# Altium PCB esp32 nfc pcb.PcbDoc
Units mm, origin at the board's own origin, x right, y up, seen from the top; angles counter-clockwise.
Board outline 27.4 x 13.3 mm, 5 copper layers (Top, Route2, Route14, Route15, Bottom), stack 0.926 mm thick; 69 components, 51 nets, 235 pads, 58 vias.
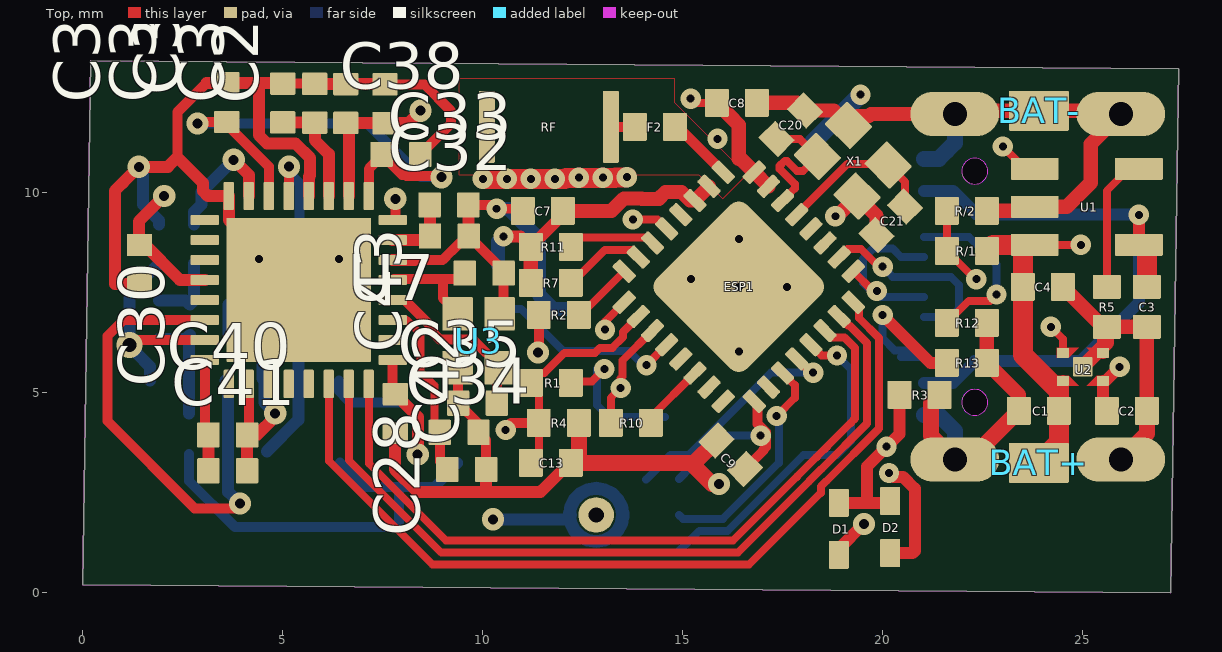
[diagram p0: Top view]
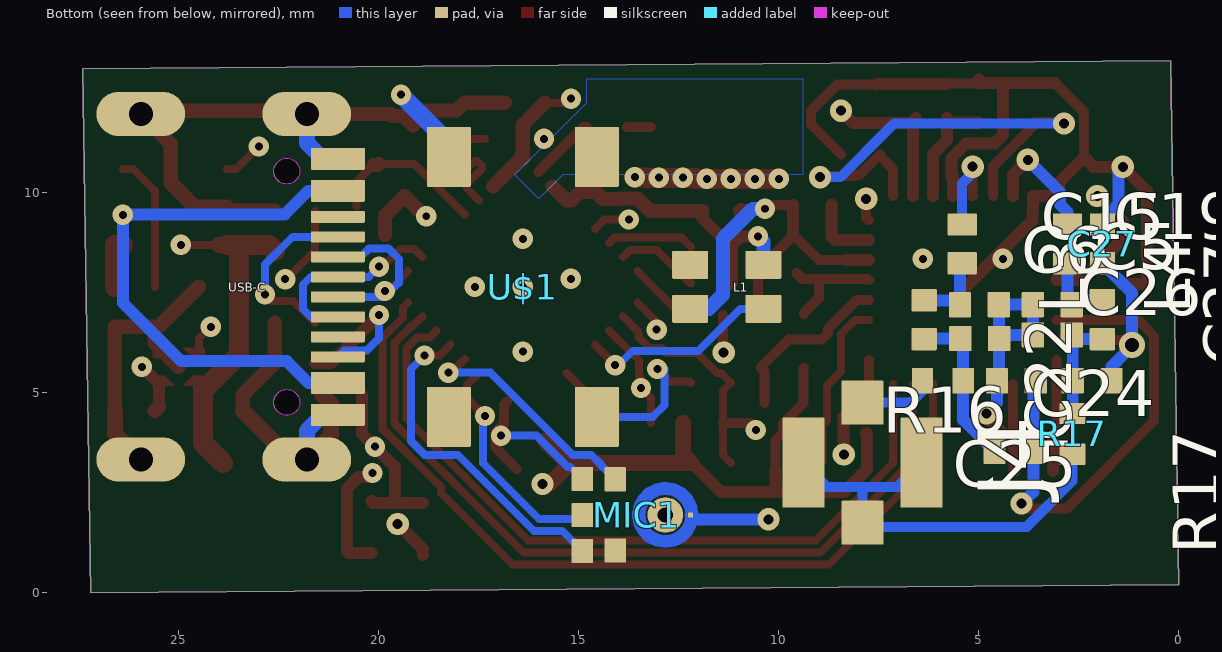
[diagram p1: Bottom view, seen from below]
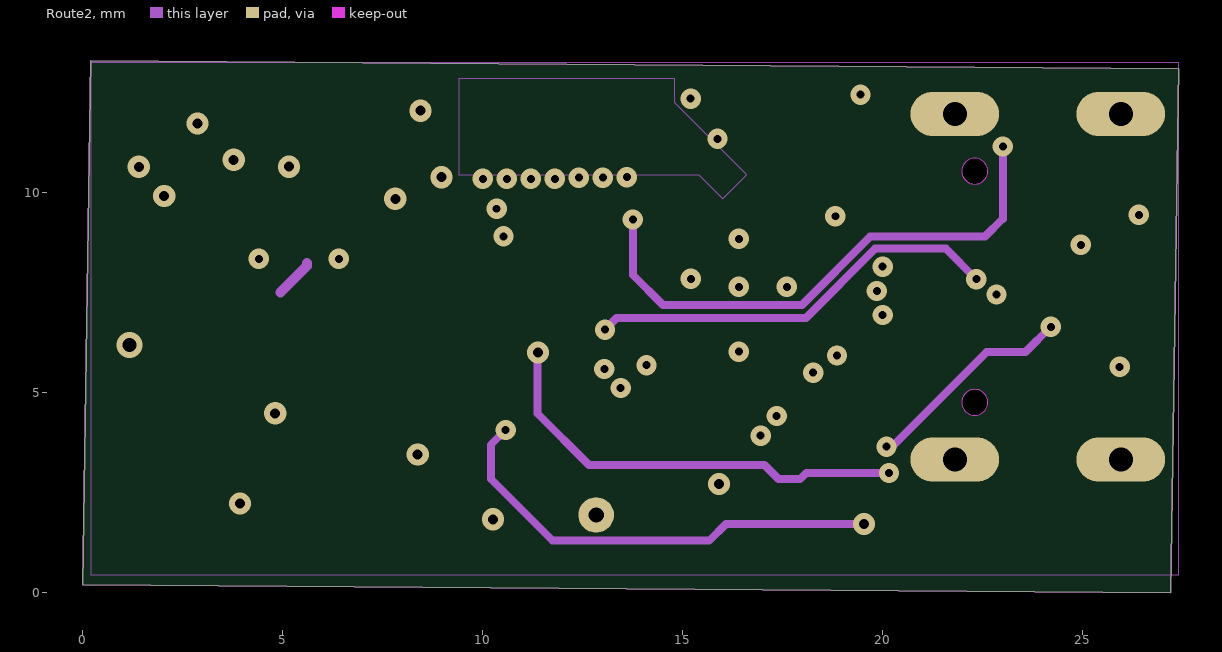
[diagram p2: Route2]
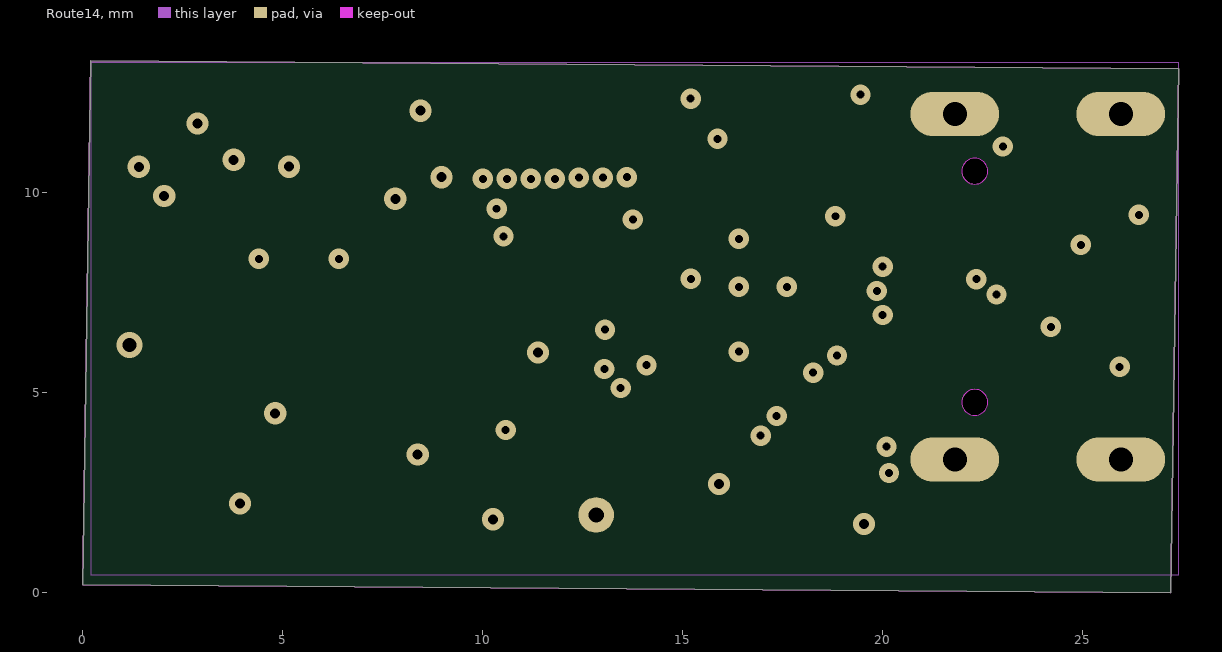
[diagram p3: Route14]
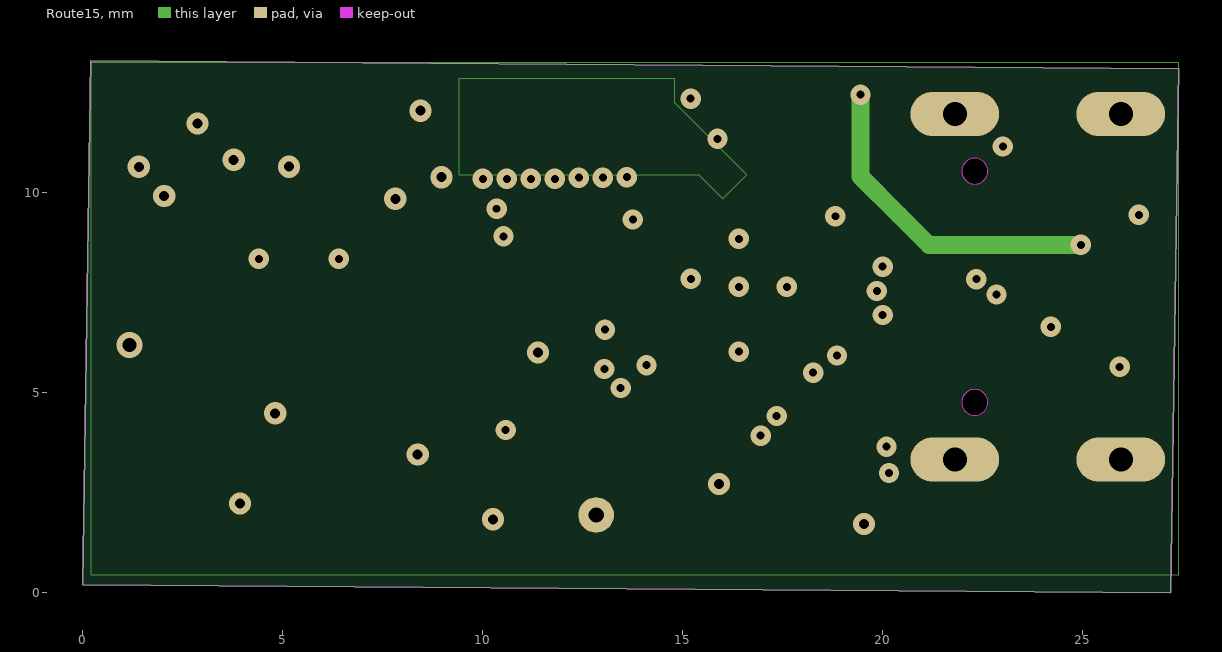
[diagram p4: Route15]

## Layer stack, top to bottom
Top Solder: solder mask 0.0102, Solder Resist, Dk 3.5
Top: signal copper 0.035
Dielectric 1: core 0.2, FR-4, Dk 4.8
Route2: signal copper 0.0175
Dielectric2: prepreg 0.265, FR-4, Dk 4.8
Route14: signal copper 0.0356
Route15: signal copper 0.0175
Dielectric3: dielectric 0.32, FR-4, Dk 4.8
Bottom: signal copper 0.035
Bottom Solder: solder mask 0.0102, Solder Resist, Dk 3.5

## Board outline
27.4,13.1 0.2,13.3 0,0.2 27.2,0
cut-out: 22.3,10.215 ccw(c22.3,10.54) 22.625,10.54 ccw(c22.3,10.54) 22.3,10.865 ccw(c22.3,10.54) 21.975,10.54 ccw(c22.3,10.54)
cut-out: 22.3,4.435 ccw(c22.3,4.76) 22.625,4.76 ccw(c22.3,4.76) 22.3,5.085 ccw(c22.3,4.76) 21.975,4.76 ccw(c22.3,4.76)

## Design rules (kind name [scope] priority, off if disabled: settings)
BoardOutlineClearance mdCopperDimension [All] p1: gap=0.254 ignorepadtopadclearanceinfootprint=FALSE except(0: Arc-SplitContinuation Track-SplitContinuation SMDPad-SplitContinuation THPad-SplitContinuation Via-SplitContinuation Fill-SplitContinuation Poly-SplitContinuation Region-SplitContinuation Text-SplitContinuation)
Clearance "Clearance (Same Net)" [All] p1: gap=0.1 ignorepadtopadclearanceinfootprint=FALSE
Clearance [All] p2: gap=0.1 ignorepadtopadclearanceinfootprint=FALSE
HoleSize [All] p1: absolutevalues=TRUE maxlimit=2540 minlimit=0.2 maxpercent=80.000 minpercent=20.000
HoleToHoleClearance mdDrill [All] p1: gap=0.152 allowstackedmicrovias=TRUE
MinimumSolderMaskSliver [All] p1 off: minsoldermaskwidth=0.254
PasteMaskExpansion Expansion_SMDPaste_OFF [InPadClass('SMDPaste_OFF')] p1: expansion=0
PasteMaskExpansion mlMinCreamFrame [All] p2: expansion=0
PolygonConnect PolygonConnect_For_PolygonThermal_ON_Width118100_Gap40000 [InPolygonClass('PolygonThermal_ON_Width118100_Gap40000') vs Not IsVia] p1: connectstyle=Relief reliefconductorwidth=0.3 reliefentries=4 polygonreliefangle="90 Angle" airgapwidth=0.102
PolygonConnect PolygonConnect_For_PolygonThermal_ON_Width60000_Gap40000 [InPolygonClass('PolygonThermal_ON_Width60000_Gap40000') vs Not IsVia] p2: connectstyle=Relief reliefconductorwidth=0.152 reliefentries=4 polygonreliefangle="90 Angle" airgapwidth=0.102
PolygonConnect ThermalVias [IsVia] p3: connectstyle=Direct reliefconductorwidth=0.254 reliefentries=4 polygonreliefangle="90 Angle" airgapwidth=0.254
PolygonConnect [All] p4: connectstyle=Relief reliefconductorwidth=0.254 reliefentries=4 polygonreliefangle="90 Angle" airgapwidth=0.254
RoutingVias [All] p1: holewidth=0.2 width=0.505 viastyle="Through Hole" minholewidth=0.2 minwidth=0.505 maxholewidth=2.54 maxwidth=2.54
SolderMaskExpansion Expansion_SMDSolder_OFF [InPadClass('SMDSolder_OFF')] p1: expansion=0 istentingtop=FALSE
SolderMaskExpansion mlMinStopFrame [All] p2: expansion=0 istentingtop=FALSE
Width [All] p1: maxlimit=0.254 minlimit=0.152 preferedwidth=0.152
26 further rules are at their usual default settings.

## Classes and differential pairs
polygon class PolygonThermal_ON_Width118100_Gap40000: Polygon_1_Net_+3V3
polygon class PolygonThermal_ON_Width60000_Gap40000: Polygon_1_Net_GND Polygon_1_NoNet Polygon_2_Net_GND Polygon_2_NoNet Polygon_3_NoNet Polygon_4_NoNet
pad class SMDSolder_OFF: ESP1-1 ESP1-2 ESP1-3 ESP1-4 ESP1-5 ESP1-6 ESP1-7 ESP1-8 ESP1-9 ESP1-10 ESP1-11 ESP1-12 ESP1-13 ESP1-14 ESP1-15 ESP1-16 ESP1-17 ESP1-18 ESP1-19 ESP1-20 ESP1-21 ESP1-22 ESP1-23 ESP1-24 ESP1-25 ESP1-26 ESP1-27 ESP1-28 ESP1-29 ESP1-30 ESP1-31 ESP1-32 ESP1-EXP U2-P1 U2-P2 U2-P3 U2-P4
pad class SMDPaste_OFF: ESP1-1 ESP1-2 ESP1-3 ESP1-4 ESP1-5 ESP1-6 ESP1-7 ESP1-8 ESP1-9 ESP1-10 ESP1-11 ESP1-12 ESP1-13 ESP1-14 ESP1-15 ESP1-16 ESP1-17 ESP1-18 ESP1-19 ESP1-20 ESP1-21 ESP1-22 ESP1-23 ESP1-24 ESP1-25 ESP1-26 ESP1-27 ESP1-28 ESP1-29 ESP1-30 ESP1-31 ESP1-32 ESP1-EXP U2-P1 U2-P2 U2-P3 U2-P4 U7-33

## Components (designator, comment, footprint, x,y, rotation, side; value= is the part's Value field where it differs from the comment)
BAT+ "" SOLDERPAD_1.5X1.0 23.9,3.25 r90 top
BAT- "" SOLDERPAD_1.5X1.0 23.9,12.05 r90 top
C1 "1µ" C0402_S 23.9,4.55 r0 top
C2 "1µ" C0402_S 26.1,4.55 r180 top
C3 "1µ" C0402_S 26.6,7.15 r90 top
C4 "1µ" C0402_S 24,7.65 r180 top
C5 "" CAPC1005X60 3.162,6.448 r180 bottom
C6 "" CAPC1005X60 4.975,6.356 r180 bottom
C7 "10µ" C0402_S 11.5,9.55 r0 top
C8 "0,1µ" C0402_S 16.35,12.25 r180 top
C9 "0,1µ" C0402_S 16.2,3.45 r315 top
C13 "1µ" C0402_S 11.7,3.25 r180 top
C15 "" CAPC1005X60 4.985,7.202 r180 bottom
C19 "" CAPC1005X60 3.162,7.202 r180 bottom
C20 "10p" C0402_S 17.7,11.7 r225 top
C21 "10p" C0402_S 20.2,9.3 r45 top
C22 "" CAPC1005X60 6.364,6.827 r270 bottom
C23 "" CAPC1005X60 1.911,6.827 r270 bottom
C24 "" CAPC1005X60 2.166,5.301 r0 bottom
C25 "" CAPC1005X60 4.121,3.536 r0 bottom
C26 "" CAPC1005X60 4.059,5.301 r180 bottom
C27 "" CAPC1005X60 1.909,8.721 r270 bottom
C28 "" CAPC1005X60 7.813,4.479 r270 top
C29 "" CAPC1005X60 7.554,12.225 r90 top
C30 "" CAPC1005X60 1.419,8.208 r270 top
C31 "" CAPC1005X60 6.575,12.232 r90 top
C32 "" CAPC1005X60 9.165,8.919 r0 top
C33 "" CAPC1005X60 9.155,9.698 r0 top
C34 "10n" CAPC1005X60 9.6,3.086 r0 top
C35 "" CAPC1005X60 9.41,4.011 r0 top
C36 "" CAPC1005X60 4.999,12.244 r90 top
C37 "" CAPC1005X60 5.799,12.238 r90 top
C38 "" CAPC1005X60 7.955,10.96 r0 top
C39 "" CAPC1005X60 3.599,12.254 r90 top
C40 "" CAPC1005X60 3.625,3.945 r0 top
C41 "" CAPC1005X60 3.625,3.05 r0 top
C42 "" CAPC1005X60 10.036,7.99 r180 top
C43 "" CAPC1005X60 9.869,4.74 r0 top
D1 "4148" SOD523 18.9,1.65 r270 top
D2 "4148" SOD523 20.186,1.694 r270 top
ESP1 "ESP32_C3_QFN32" QFN32 16.4,7.65 r315 top
F2 "0" R0402 14.3,11.65 r180 top
J4 "UMC-JACK" A-1JB 7.903,3.251 r90 bottom
L1 "" WS2812_2020 11.3,7.65 r0 bottom
L3 "" INDC1006X60N 5.414,8.721 r270 bottom
L4 "" INDC1006X60N 2.785,8.721 r270 bottom
MIC1 "SPH0645LM4H-BSPH0645LM4H-B_KNO" SPH0645LM4H-B_KNO 13.598,1.945 r0 bottom
R1 "1k" R0402 11.7,5.25 r0 top
R2 "1k" R0402 11.9,6.95 r0 top
R3 "1M" R0402 20.921,4.95 r180 top
R4 "10k" R0402 11.9,4.25 r180 top
R5 "47.5k" R0402 25.6,7.15 r270 top
R7 "10k" R0402 11.7,7.75 r0 top
R10 "10k" R0402 13.7,4.25 r0 top
R11 "10k" R0402 11.7,8.65 r0 top
R12 "5.1k" R0402 22.1,6.75 r0 top
R13 "5.1k" R0402 22.1,5.75 r0 top
R16 "" RESC1005X40 5.899,5.301 r0 bottom
R17 "" RESC1005X40 2.657,3.973 r270 bottom
R/1 "1M" R0402 22.1,8.55 r180 top
R/2 "250k" R0402 22.1,9.55 r0 top
RF "" ANT3216LL00R2400A 11.65,11.65 r270 top
U1 "" SOT23-5 25.1,9.65 r270 top
U2 "" TDFN4 25,5.65 r90 top
U3 "NX2016SA-27.12MHZ-EXS00A-CS113SMD04_NX2016S_NDK" SMD04_NX2016S_NDK 9.894,6.3 r0 top
U7 "ST25R3916B-AQWTVFQFPN32_5X5_WETTABLE_STM-L" VFQFPN32_5X5_WETTABLE_STM-L 5.4,7.57 r180 top
U$1 "" BUTTON_ST-1187-3 16.4,7.65 r90 bottom
USB-C "" USBC_C393939 21.8,7.65 r270 bottom
X1 "" XTYL_2016 19.25,10.8 r315 top

## Footprints (in the part's own frame and the unit in brackets; to place one, negate y for a bottom-side part, rotate by r counter-clockwise, add the part's x,y. Pads: shape width x height; smd on the part's side, far side on the other; paste and mask are expansions set on the pad)
A-1JB [mm] "A-1JB"
  rrect4% 1.1x1.05 smd: 1(1.5,0) 2_1(-1.5,0)
  rrect4% 2.25x1.05 smd: 2_0(0,1.475) 2_2(0,-1.475)
  body extent -2.05,-2 2.05,2, height 1.27
ANT3216LL00R2400A [mm] "ANT3216LL00R2400A"
  rrect12% 1.8x0.4 smd: P1(0,1.55) P2(0,-1.55)
  body extent -0.9,-1.75 0.9,1.75, height 1.27
BUTTON_ST-1187-3 [mm] "BUTTON_ST-1187-3"
  rrect4% 1.5x1.1 smd: P1(-3.25,1.85) P2(3.25,1.85) P3(-3.25,-1.85) P4(3.25,-1.85)
  body extent -4,-2.4 4,2.4, height 1.27
C0402_S [mm] "C0402_S"
  rrect8% 0.6x0.7 smd: P$1(-0.5,0) P$2(0.5,0)
  body extent -0.8,-0.35 0.8,0.35, height 1.27
CAPC1005X60 [mm] "CAPC1005X60"
  rrect9% 0.56x0.629 smd: 1(-0.485,0) 2(0.485,0)
  body extent -0.77,-0.32 0.77,0.32, height 1.27
INDC1006X60N [mm] "INDC1006X60N"
  rrect9% 0.56x0.729 smd: 1(-0.485,0) 2(0.485,0)
  body extent -0.77,-0.37 0.77,0.37, height 1.27
QFN32 [mm] "QFN32"
  rrect30% 0.6x0.275 smd paste+0 mask+0: 1(-2.3,1.75) 2(-2.3,1.25) 3(-2.3,0.75) 4(-2.3,0.25) 5(-2.3,-0.25) 6(-2.3,-0.75) 7(-2.3,-1.25) 8(-2.3,-1.75) 17(2.3,-1.75) 18(2.3,-1.25) 19(2.3,-0.75) 20(2.3,-0.25) 21(2.3,0.25) 22(2.3,0.75) 23(2.3,1.25) 24(2.3,1.75)
  rrect30% 0.275x0.6 smd paste+0 mask+0: 9(-1.75,-2.3) 10(-1.25,-2.3) 11(-0.75,-2.3) 12(-0.25,-2.3) 13(0.25,-2.3) 14(0.75,-2.3) 15(1.25,-2.3) 16(1.75,-2.3) 25(1.75,2.3) 26(1.25,2.3) 27(0.75,2.3) 28(0.25,2.3) 29(-0.25,2.3) 30(-0.75,2.3) 31(-1.25,2.3) 32(-1.75,2.3)
  rrect20% 3.2x3.2 smd paste+0 mask+0: EXP(0,0)
  body extent -2.6,-2.6 2.6,2.6, height 3.81
R0402 [mm] "R0402"
  rrect8% 0.6x0.7 smd: 1(-0.5,0) 2(0.5,0)
  body extent -0.8,-0.35 0.8,0.35, height 3.81
RESC1005X40 [mm] "RESC1005X40"
  rrect9% 0.535x0.644 smd: 1(-0.507,0) 2(0.507,0)
  body extent -0.78,-0.32 0.78,0.32, height 1.27
SMD04_NX2016S_NDK [mil] "SMD04_NX2016S_NDK"
  rrect6% 30x33 smd: 1(-20.67,26.57) 2(-20.67,-26.57) 3(20.67,-26.57) 4(20.67,26.57)
  body extent -37,-45 37,45, height 150
SOD523 [mm] "SOD523"
  rrect10% 0.7x0.5 smd: A(0.7,0) C(-0.6,0)
  body extent -0.95,-0.46 1.05,0.46, height 3.81
SOLDERPAD_1.5X1.0 [mm] "SOLDERPAD_1.5X1.0"
  rrect5% 1x1.5 smd: 1(0,0)
  body extent -0.5,-0.75 0.5,0.75, height 1.27
SOT23-5 [mm] "SOT23-5"
  rrect9% 0.55x1.2 smd: 1(-0.95,-1.3) 2(0,-1.3) 3(0.95,-1.3) 4(0.95,1.3) 5(-0.95,1.3)
  body extent -1.48,-1.9 1.48,1.9, height 3.81
SPH0645LM4H-B_KNO [mil] "SPH0645LM4H-B_KNO"
  rrect9% 21x24 smd: 1(51.59,35.43) 2(19.24,35) 4(19.24,-35) 5(51.59,-35.43) 6(51.59,0)
  rrect40% 5x5 smd: 3(-55,0)
  round 35 hole 15: 7(-30.06,0)
  Top region: -40.1,-30.91 -30.06,-32.51 -20.01,-30.91 -10.94,-26.3 -3.76,-19.11 0.86,-10.05 2.44,-0.03 2.3,3.33 -10.15,2.25 -10.05,0.05 -10.06,0.06 -10.06,0.03 -10.06,0.03 -10.06,0.04 -11.04,-6.19 -11.05,-6.18 -11.04,-6.17 -11.04,-6.18 -11.04,-6.17 -13.88,-11.75 -13.88,-11.75 -13.87,-11.75 -13.88,-11.76 -13.89,-11.76 -18.29,-16.17 -18.29,-16.18 -18.3,-16.19 -18.3,-16.18 -18.3,-16.18 -23.88,-19.02 -23.87,-19.02 -23.86,-19.02 -23.88,-19.03 -23.9,-19.02 -30.05,-19.99 -30.06,-19.99 -30.06,-19.99 -30.06,-19.99 -30.06,-19.99 -36.21,-19.02 -36.23,-19.03 -36.25,-19.02 -36.24,-19.02 -36.23,-19.02 -41.81,-16.18 -41.81,-16.18 -41.81,-16.19 -41.82,-16.18 -41.82,-16.17 -46.22,-11.76 -46.23,-11.76 -46.24,-11.75 -46.23,-11.75 -46.23,-11.75 -49.07,-6.17 -49.07,-6.18 -49.07,-6.17 -49.06,-6.18 -49.07,-6.19 -50.05,0.04 -50.06,0.05 -50.06,0.03 -50.06,0.04 -50.06,0.05 -49.96,2.25 -62.41,3.33 -62.56,-0.03 -60.97,-10.05 -56.35,-19.11 -49.17,-26.3
  Top region: -10.15,-2.25 2.3,-3.33 2.44,0.03 0.86,10.05 -3.76,19.11 -10.94,26.3 -20.01,30.91 -30.06,32.51 -40.1,30.91 -49.17,26.3 -56.35,19.11 -60.97,10.05 -62.56,0.03 -62.41,-3.33 -49.96,-2.25 -50.06,-0.05 -50.06,-0.04 -50.06,-0.03 -50.06,-0.05 -50.05,-0.04 -49.07,6.19 -49.06,6.18 -49.07,6.17 -49.07,6.18 -49.07,6.17 -46.23,11.75 -46.23,11.75 -46.24,11.75 -46.23,11.76 -46.22,11.76 -41.82,16.17 -41.82,16.18 -41.81,16.19 -41.81,16.18 -41.81,16.18 -36.23,19.02 -36.24,19.02 -36.25,19.02 -36.23,19.03 -36.21,19.02 -30.06,19.99 -30.06,19.99 -30.06,19.99 -30.06,19.99 -30.05,19.99 -23.9,19.02 -23.88,19.03 -23.86,19.02 -23.87,19.02 -23.88,19.02 -18.3,16.18 -18.3,16.18 -18.3,16.19 -18.29,16.18 -18.29,16.17 -13.89,11.76 -13.88,11.76 -13.87,11.75 -13.88,11.75 -13.88,11.75 -11.04,6.17 -11.04,6.18 -11.04,6.17 -11.05,6.18 -11.04,6.19 -10.06,-0.04 -10.06,-0.03 -10.06,-0.03 -10.06,-0.06 -10.05,-0.05
  body extent -62,-48 62,48, height 150
TDFN4 [mm] "TDFN4"
  rrect10% 0.48x0.48 smd: EXP(0,0)
  rrect10% 0.25x0.3 smd paste+0 mask+0: P1(-0.35,-0.5) P2(0.35,-0.5) P3(0.35,0.5) P4(-0.35,0.5)
  Top region: -0.475,-0.65 -0.225,-0.65 -0.225,-0.35 -0.475,-0.1
  Top region: 0.225,-0.65 0.475,-0.65 0.475,-0.1 0.225,-0.35
  Top region: 0.225,0.35 0.475,0.1 0.475,0.65 0.225,0.65
  Top region: -0.475,0.65 -0.475,0.1 -0.225,0.35 -0.225,0.65
  body extent -0.64,-0.65 0.48,0.65, height 3.81
USBC_C393939 [mm] "USBC_C393939"
  rrect9% 0.55x1.35 smd: A1B12(-3.2,0.775) A4B9(-2.4,0.775) B1A12(3.2,0.775) B4A9(2.4,0.775)
  rrect18% 0.275x1.35 smd: A5(-1.25,0.775) A6(-0.25,0.775) A7(0.25,0.775) B5(1.75,0.775) B6(0.75,0.775) B7(-0.75,0.775) B8(1.25,0.775)
  rrect16% 0.3x1.35 smd: A8(-1.75,0.775)
  oval 1.108x2.216 hole 0.6: S1(-4.32,0) S2(4.32,0) S3(-4.32,-4.15) S4(4.32,-4.15)
  body extent -4.88,-5.27 4.88,1.45, height 1.27
VFQFPN32_5X5_WETTABLE_STM-L [mil] "VFQFPN32_5X5_WETTABLE_STM-L"
  rrect20% 28x10 smd: 1(-92.5,68.9) 2(-92.5,49.21) 3(-92.5,29.53) 4(-92.5,9.84) 5(-92.5,-9.84) 6(-92.5,-29.53) 7(-92.5,-49.21) 8(-92.5,-68.9) 17(92.5,-68.9) 18(92.5,-49.21) 19(92.5,-29.53) 20(92.5,-9.84) 21(92.5,9.84) 22(92.5,29.53) 23(92.5,49.21) 24(92.5,68.9)
  rrect20% 10x28 smd: 9(-68.9,-92.5) 10(-49.21,-92.5) 11(-29.53,-92.5) 12(-9.84,-92.5) 13(9.84,-92.5) 14(29.53,-92.5) 15(49.21,-92.5) 16(68.9,-92.5) 25(68.9,92.5) 26(49.21,92.5) 27(29.53,92.5) 28(9.84,92.5) 29(-9.84,92.5) 30(-29.53,92.5) 31(-49.21,92.5) 32(-68.9,92.5)
  rrect1% 142x142 smd paste+0: 33(0,0)
  body extent -107,-107 107,107, height 150
WS2812_2020 [mm] "WS2812_2020"
  rrect7% 0.9x0.7 smd: DI(-0.915,0.55) DO(0.915,-0.55) GND(0.915,0.55) VDD(-0.915,-0.55)
  body extent -1.37,-0.9 1.37,0.9, height 1.27
XTYL_2016 [mil] "XTYL_2016"
  rrect6% 35.43x31.5 smd: P1(-27.56,-21.65) P2(27.56,-21.65) P3(27.56,21.65) P4(-27.56,21.65)
  body extent -45,-37 45,37, height 50

## Part data
BAT+ BAT-: library part SOLDERPAD_1.5X1.0, PackageName=SOLDERPAD_1.5X1.0
C1 C2 C3 C4 C7 C8 C9 C13 C20 C21: library part C0402_S, PackageName=C0402_S
C5 C6 C15 C19 C22 C23 C24 C25 C26 C27 C28 C29 C30 C31 C32 C33 C34 C35 C36 C37 C38 C39 C40 C41 C42 C43: library part CAPC1005X60, PackageName=CAPC1005X60
D1 D2: library part SOD523, PackageName=SOD523
ESP1: library part QFN32, PackageName=QFN32
F2 R1 R2 R3 R4 R5 R7 R10 R11 R12 R13 R/1 R/2: library part R0402, PackageName=R0402
J4: library part A-1JB, PackageName=A-1JB
L1: library part WS2812_2020, PackageName=WS2812_2020
L3 L4: library part INDC1006X60N, PackageName=INDC1006X60N
MIC1: library part SPH0645LM4H-B_KNO, PackageName=SPH0645LM4H-B_KNO
R16 R17: library part RESC1005X40, PackageName=RESC1005X40
RF: library part ANT3216LL00R2400A, PackageName=ANT3216LL00R2400A
U1: library part SOT23-5, PackageName=SOT23-5
U2: library part TDFN4, PackageName=TDFN4
U3: library part SMD04_NX2016S_NDK, PackageName=SMD04_NX2016S_NDK
U7: library part VFQFPN32_5X5_WETTABLE_STM-L, PackageName=VFQFPN32_5X5_WETTABLE_STM-L
U$1: library part BUTTON_ST-1187-3, PackageName=BUTTON_ST-1187-3
USB-C: library part USBC_C393939, PackageName=USBC_C393939
X1: library part XTYL_2016, PackageName=XTYL_2016

## Free pads (board coordinates)
  round 0.65 hole 0.65 unplated: MH1(22.3,4.76) MH2(22.3,10.54)

## Via types
v1: diameter 0.505/0.505/0.505/0.505/0.505 (per signal layer), hole 0.2, Top to Bottom, 42 vias
v2: diameter 0.555/0.555/0.555/0.555/0.555 (per signal layer), hole 0.25, Top to Bottom, 15 vias
v3: diameter 0.655/0.655/0.655/0.655/0.655 (per signal layer), hole 0.35, Top to Bottom, 1 vias

## Nets (pads, with @x,y where several pads share a name; then routed paths per layer and width w, separated by ;. In a path a pad name is that pad's centre, name@x,y a point inside that pad or via, vN(x,y) a via of type N, cw(c..) or ccw(c..) an arc to the next point about the centre after c; other vN are vias at no path point)
+3V3: C2.P$2 C7.P$2 C8.P$2 C9.P$2 C28.1 C29.1 C30.1 C31.1 ESP1.2 ESP1.3 ESP1.11 ESP1.17 ESP1.31 ESP1.32 L1.VDD MIC1.5 R7.1 R10.1 R11.1 U2.P1 U7.1 U7.8 U7.10 U7.20 | length 30.9
  Top w0.2: R10.1 13.2,4.873 v1(13.448,5.121) 13.448,5.361 13.49,5.403 13.49,5.8 ESP1.11 ; v1(15.198,12.352) 15.3,12.25 C8.P$2
  Top w0.25: U7.1 7.75,5.027 C28.1 ; U7.8 7.813,9.383 v2(7.813,9.85) ; C9.P$2 17.017,3.56 17.017,3.584 17.078,3.645 v1@17.078,4.017 ; ESP1.17 16.87,4.705 16.87,4.225 v1@17.078,4.017 ; v1(16.948,3.927) 16.988,3.927 v1@17.078,4.017
  Top w0.3: v2(2.037,9.923) 1.4,9.286 1.4,8.711 C30.1 1.557,8.693 2.4,7.85 2.43,7.82 U7.20 ; U7.10 C31.1@6.65,11.791 ; C28.1 8.377,4.399 8.377,3.641 8.373,3.636 v2(8.373,3.456) ; v2(8.447,12.052) 8.135,11.741 C29.1 6.7,11.741 C31.1@6.65,11.791 ; v1(10.519,8.912) 10.938,8.912 11.2,8.65 11.903,9.353 C7.P$2@11.903,9.55 ; C2.P$2 25.5,4.65 U2.P1 25.573,5.3 v1(25.923,5.65) ; C31.1@6.576,11.749 C31.1 C31.1@6.576,11.749 ; C31.1@6.576,11.749 C31.1@6.576,11.865 ; C31.1@6.576,11.749 C31.1@6.576,11.865 ; C31.1@6.576,11.865 C31.1@6.65,11.791
  Top w0.35: C7.P$2@11.903,9.55 C7.P$2 13.221,9.55 13.521,9.85 13.532,9.861 13.968,9.861 13.979,9.85 14.4,9.85 14.568,10.018 14.971,10.018
  Top w0.352: R7.1@11.2,7.75 R11.1@11.2,8.65 ; 14.971,10.018 15.182,9.807 ESP1.3 ESP1.2 ; C8.P$2 16.274,11.826 16.274,11.815 16.4,11.689 16.4,11.45 16.4,10.85 16.453,10.85 ESP1.32 ESP1.31 ; C2.P$2@25.5,4.65 C2.P$2
  Bottom w0.2: MIC1.5 15.214,3.15 15.278,3.15 16.055,3.927 v1(16.948,3.927)
  Bottom w0.35: L1.VDD 10.385,8.778 v1(10.519,8.912)
+VBAT: BAT+.1 C1.P$2 C4.P$2 R/1.1 U1.3 U2.P4 U$1.P2 | length 19.6
  Top w0.2: U1.3@24,8.7 v1(24.95,8.7)
  Top w0.3: C1.P$2 24.5,4.65 U2.P4
  Top w0.4: U1.3 U1.3@24,8.7
  Top w0.5: R/1.1 22.75,8.7 U1.3@23.4,8.7 ; U1.3 U1.3@23.4,8.7 ; BAT+.1 24.4,3.75 C1.P$2 24.4,5.05 23.5,5.95 C4.P$2 23.5,8.6 U1.3@23.4,8.7
  Route15 w0.45: v1(19.441,12.451) 19.441,10.409 20.4,9.45 21.15,8.7 v1(24.95,8.7)
  Bottom w0.45: U$1.P2 18.25,11.261 v1(19.441,12.451)
ADC: ESP1.9 R/1.2 R/2.1 | length 13.4
  Top w0.2: v1(13.052,6.576) 13.052,6.777 ESP1.9 ; R/2.1 R/1.2 22.31,7.84 v1(22.339,7.84)
  Route2 w0.2: v1(13.052,6.576) 13.347,6.87 18.077,6.87 19.81,8.603 21.576,8.603 v1(22.339,7.84)
BUTTON: C13.P$2 D1.A ESP1.10 R1.1 R4.2 | length 19.1
  Top w0.2: C13.P$2@11.2,3.25 11.4,3.45 R4.2 11.4,5.05 11.2,5.25 11.45,5.5 11.547,5.5 12.047,6 12.807,6 12.931,6.123 13.24,6.123 13.505,6.388 13.505,6.522 ESP1.10@13.89,6.908
  Top w0.25: v1(10.575,4.073) 10.575,4.113 10.711,4.25 R4.2
  Top w0.3: D1.A 18.9,1.095 v2(19.528,1.723)
  Route2 w0.2: v1(10.575,4.073) 10.2,3.698 10.2,2.85 11.749,1.301 15.661,1.301 16.083,1.723 v2(19.528,1.723)
DIN: ESP1.12 L1.DI | length 5
  Top w0.2: v1(14.09,5.69) 14.09,5.693 ESP1.12
  Bottom w0.2: L1.DI 10.958,7.1 12.008,6.05 13.65,6.05 14.01,5.69 v1(14.09,5.69)
EN: ESP1.7 R7.2 | length 2.1
  Top w0.2: R7.2 12.23,7.75 13.054,8.574 13.708,8.574 ESP1.7
EN_LDO: D1.C D2.C R3.2 U2.P3 | length 10.5
  Top w0.2: v1(24.2,6.65) 24.5,6.35 U2.P3
  Top w0.3: D1.C 19.6,2.25 ; D2.C 20.142,2.25 19.6,2.25 ; R3.2 20.421,3.975 v1(20.097,3.651) 19.6,3.154 19.6,2.25
  Route2 w0.2: v1(20.097,3.651) 20.231,3.651 22.599,6.019 23.569,6.019 v1(24.2,6.65)
GND: BAT-.1 C1.P$1 C2.P$1 C3.P$1 C4.P$1 C5.1 C6.2 C7.P$1 C8.P$1 C9.P$1 C13.P$1 C15.2 C19.1 C20.P$1 C21.P$1 C26.1 C27.1 C28.2 C29.2 C30.2 C31.2 C32.2 C33.2 C34.2 C35.2 C36.2 C37.2 C38.2 C39.2 C40.2 C41.2 C42.1 C43.1 ESP1.EXP L1.GND MIC1.3 R3.1 R4.1 R5.2 R12.2 R13.2 R/2.2 U1.2 U2.EXP U2.P2 U3.2 U3.4 U7.6 U7.12 U7.16 U7.26 U7.33 USB-C.A1B12 USB-C.B1A12 USB-C.S1 USB-C.S2 USB-C.S3 USB-C.S4 X1.P2 X1.P4 | length 102.3
  Top w0.2: C32.2@9.597,8.919 9.6,8.919 C32.2 ; C35.2 C35.2@9.895,4.229
  Top w0.25: 2.363,10.887 2.363,12.013 3.089,12.739 ; C40.2 4.15,3.986 U7.26 ; C36.2 C37.2@5.793,12.729 ; C29.2 8.54,12.71 9.2,12.05 9.2,11.721 C38.2@8.439,10.96 ; 8.312,8.32 8.775,8.32 8.997,8.32 9.207,8.529 9.211,8.529 C32.2@9.6,8.919 ; U3.2 9.384,5.61 9.384,4.74 9.895,4.229 C35.2 10.085,3.821 C34.2 ; C33.2 10.25,9.698 v1(10.347,9.6) C7.P$1@10.95,9.6 ; C32.2 10.52,8.048 C42.1 10.52,7.076 U3.4
  Top w0.3: C30.2 0.8,7.724 0.8,10.05 1,10.25 v2(1.4,10.65) 2.126,10.65 2.363,10.887 3,10.25 3,10.05 3.131,9.919 U7.16 3.65,9.527 3.656,9.52 3.656,9.313 U7.33 ; 3.089,12.739 C39.2 ; C41.2 C40.2 4.354,3.945 4.811,4.402 v2(4.811,4.487) ; C36.2 4.989,12.739 C39.2 ; U7.12 5.65,10.404 5.68,10.434 5.68,10.871 5.321,11.229 4.611,11.229 4.4,11.44 4.4,12.739 4.2,12.739 ; C37.2@5.793,12.729 C37.2 ; C37.2@5.8,12.724 C37.2 ; C29.2 7.547,12.717 C31.2 6.576,12.718 6.571,12.723 C37.2 ; U7.6@7.75,8.32 8.312,8.32 ; C28.2 7.8,3.982 7.8,3.082 8.361,2.521 9.269,2.521 10,2.521 ; C33.2 9.649,9.688 C32.2 ; C34.2 10.085,2.606 10,2.521 ; C7.P$1@10.95,9.6 C7.P$1 ; C13.P$1 12.174,3.25 11.574,2.65 11.445,2.521 10,2.521 ; U2.P2 25.5,6.35 R5.2@25.6,6.45 ; C39.2 4.2,12.739 ; 4.2,12.739 4.991,12.739 C36.2@5,12.729 ; C36.2@5,12.729 5,12.835 C36.2@5,12.729
  Top w0.352: C8.P$1 17.857,12.25 C20.P$1 18.774,12.054 X1.P4 19.383,11.923 19.66,11.923 19.707,11.97 USB-C.S1 21.88,12.05 BAT-.1@24.2,12.05 ; v1(18.813,9.413) 18.853,9.413 X1.P2 19.847,9.426 C21.P$1 ; R12.2 R13.2 23.4,4.95 C1.P$1 ; R/2.2 23.7,9.55 U1.2 24.6,9.65 25.2,10.25 25.2,11.22 25.95,11.97 25.87,12.05 BAT-.1@24.2,12.05 ; BAT-.1 BAT-.1@24.2,12.05 ; C4.P$1 25.5,6.65 R5.2 ; U2.EXP 25.6,6.25 25.6,6.45 R5.2 ; C2.P$1 C3.P$1 R5.2
  Top w0.4: R4.1 12.4,3.45 C13.P$1 15.2,3.25 ; C9.P$1 15.293,3.25 15.2,3.25 ; v2(15.905,2.716) 15.734,2.716 15.2,3.25 ; R3.1 21.2,4.729 21.2,4.25 21.2,3.93 USB-C.S2 22.18,3.33 C1.P$1 ; USB-C.S4@25.95,3.33 26.6,3.98 C2.P$1
  Top w0.5: v1(10,10.35) v1(10.6,10.35) v1(11.2,10.35) v1(11.8,10.35) 12.058,10.35 12.083,10.375 v1@12.4,10.375 ; v1(12.4,10.377) v1@12.4,10.375 ; v1(13,10.377) v1@13,10.375 ; v1(13.6,10.388) 13.598,10.386 13.314,10.386 13.304,10.375 v1@13,10.375 ; v1@12.4,10.375 v1@13,10.375
  Route2 w0.25: 4.938,7.507 5.6,8.17 5.6,8.25
  Bottom w0.3: v2(1.4,10.65) 1.509,10.541 1.509,9.704 1.909,9.304 C27.1 ; v2(4.811,4.487) 4.544,4.754 C26.1 4.49,5.355 C6.2 C6.2@4.399,6.448 ; v2(10.256,1.837) 12.093,1.837 MIC1.3 ; C6.2@4.399,6.448 4.5,6.549 C15.2 C19.1 C5.1 C6.2@4.399,6.448
  Bottom w0.35: v1(10.347,9.6) 10.65,9.6 11.4,8.85 11.4,7.45 11.6,7.25 11.75,7.1 L1.GND
  Bottom w0.4: USB-C.B1A12 21.4,4.45 21.8,4.05 USB-C.S2 ; USB-C.A1B12 21.4,10.85 21.6,11.05 21.8,11.25 USB-C.S1
  other v1: 16.4,6.027 16.4,7.65 17.6,7.65 15.2,7.85 4.4,8.35 6.4,8.35 16.4,8.85 15.871,11.35
GPIO2: ESP1.6 R11.2 | length 2.2
  Top w0.2: R11.2 12.431,8.881 14.109,8.881 ESP1.6
GPIO8: ESP1.14 R10.2 | length 1.7
  Top w0.2: R10.2 14.2,4.389 ESP1.14
GPIO9: ESP1.15
GPIO10: ESP1.16
GPIO18: ESP1.25 USB-C.A7 USB-C.B7 | length 4.9
  Top w0.2: ESP1.25 19.757,7.546 v1(19.85,7.546)
  Bottom w0.2: v1(19.85,7.546) v1@19.85,7.4 ; USB-C.A7 v1@19.85,7.4 ; USB-C.B7 20.45,8.4 20.247,8.603 19.753,8.603 19.5,8.35 19.5,7.75 v1@19.85,7.4
GPIO19: ESP1.26 USB-C.A6 USB-C.B6 | length 5
  Top w0.2: ESP1.26 19.118,8.6 19.45,8.6 19.9,8.15 v1(19.998,8.15)
  Bottom w0.2: v1(19.998,8.15) 20.248,7.9 USB-C.A6 21.7,7.9 21.9,7.7 21.9,7.1 21.7,6.9 USB-C.B6
LATCH: ESP1.8 R2.2 | length 1.6
  Top w0.2: R2.2 12.447,6.95 ESP1.8
MISO/SDA: ESP1.22 U7.32 | length 19.1
  Top w0.2: U7.32 7.15,3.237 9.087,1.301 15.665,1.301 16.251,1.301 17.85,2.9 17.85,2.902 18.348,3.4 18.35,3.4 18.6,3.65 ; 18.55,3.6 18.6,3.65 ; ESP1.22 18.728,6.383 19.043,6.383 19.308,6.117 19.308,5.85 ; 19.308,5.743 19.308,5.85 ; 18.6,3.65 19.2,4.25 19.308,4.358 19.308,5.85
MOSI: ESP1.23 U7.31 | length 20.1
  Top w0.2: U7.31 6.65,3.313 8.962,1.001 16.375,1.001 18.15,2.776 18.15,2.778 18.472,3.1 18.474,3.1 19.608,4.233 19.608,6.242 19.167,6.682 19.135,6.682 ESP1.23@18.91,6.908
N$1: R1.2 U$1.P3 | length 3.9
  Top w0.2: R1.2 12.23,5.28 12.727,5.28 v1(13.037,5.59)
  Bottom w0.2: v1(13.037,5.59) 12.86,5.59 12.86,4.69 13.15,4.4 U$1.P3
N$2: C19.2 C23.1 L4.2 | length 1.9
  Bottom w0.3: C23.1 2.568,7.311 C19.2 2.785,7.309 L4.2
N$3: C42.2 U3.1 U7.5 | length 2.9
  Top w0.25: U7.5 7.78,7.85 9,7.85 ; U3.1 9.369,6.998 9,7.367 9,7.85 ; C42.2 9.411,7.85 9,7.85
N$4: ESP1.1 F2.1 | length 1.7
  Top w0.25: F2.1 14.875,11.65 ESP1.1
N$5: C15.1 C22.1 L3.2 | length 2
  Bottom w0.3: L3.2 5.469,8.181 C15.1 5.579,7.311 C22.1
N$6: F2.2 RF.P1 | length 0.6
  Top w0.25: RF.P1 F2.2
N$7: C32.1 C33.1 U7.7 | length 1.8
  Top w0.3: U7.7 8.581,8.82 C32.1 8.68,9.688 C33.1
N$8: C5.2 C23.2 C24.2 R17.1 | length 2.8
  Bottom w0.3: C23.2 2.572,6.342 C5.2 2.65,6.42 C24.2 2.65,4.488 R17.1
N$9: C6.1 C22.2 C25.2 R16.1 | length 4.1
  Bottom w0.3: C25.2 5.391,4.322 5.391,5.128 R16.1 5.391,6.288 C6.1 6.349,6.356 C22.2
N$16: D2.A R2.1 | length 15
  Top w0.25: v2(11.377,6.006) 11.4,6.028 R2.1
  Top w0.3: v1(20.153,2.996) 20.255,2.894 20.511,2.894 20.8,2.605 20.8,1.05 20.744,0.994 D2.A
  Route2 w0.152: v2@11.363,5.991 v2(11.377,6.006)
  Route2 w0.2: v2@11.363,5.991 11.363,4.813 11.363,4.487 12.656,3.194 17.047,3.194 17.396,2.845 17.936,2.845 18.088,2.996 v1(20.153,2.996)
N$18: R13.1 USB-C.B5 | length 4.5
  Top w0.3: v1(19.998,6.941) 21.188,5.75 R13.1
  Bottom w0.2: v1(19.998,6.941) 19.998,6.362 20.297,6.062 20.863,6.062 USB-C.B5 USB-C.B5@20.459,5.9
N$23: R5.1 U1.5 | length 3.4
  Top w0.2: R5.1 25.6,10.05 26.15,10.6 U1.5
N$25: R12.1 USB-C.A5 | length 4.4
  Top w0.2: R12.1 22.15,7.3 22.681,7.3 v1(22.841,7.46)
  Bottom w0.2: USB-C.A5 22.15,8.9 22.841,8.209 v1(22.841,7.46)
N$26: C20.P$2 ESP1.30 X1.P1 | length 3.6
  Top w0.2: C20.P$2 17.926,11.346 X1.P1 18.01,10.55 17.85,10.55 17.6,10.8 17.55,10.8 17.42,10.67 17.42,10.6 17.8,10.22 17.8,10.111 ESP1.30
N$27: C21.P$2 ESP1.29 X1.P3 | length 4
  Top w0.2: ESP1.29 19.12,10.724 X1.P3@20,10.724 ; X1.P3 20.554,10.274 C21.P$2
  Top w0.35: X1.P3@20,10.724 20.03,10.694 X1.P3
N$29: C34.1 C35.1 U7.3 | length 4.6
  Top w0.2: U7.3 U7.3@8.092,6.82 ; C35.1@8.925,4.165 8.788,4.303 8.788,5.18 8.438,5.53 8.438,6.473 8.261,6.65 8.131,6.781 ; U7.3@8.092,6.82 8.131,6.781 ; U7.3@8.092,6.82 8.131,6.781
  Top w0.25: C35.1@8.925,4.165 C35.1 8.925,3.276 C34.1
N$31: C36.1 C37.1 U7.11 | length 3.2
  Top w0.3: C36.1 5.694,11.759 C37.1@5.8,11.865 ; U7.11 6.15,10.966 5.8,11.316 C37.1@5.8,11.865 ; C37.1@5.8,11.865 5.8,11.754 C37.1@5.8,11.865
N$32: J4.1 R16.2 | length 1.9
  Bottom w0.25: R16.2 6.406,5.044 6.6,4.85 6.699,4.751 J4.1
N$33: C38.1 C39.1 U7.9 U7.14 | length 12.6
  Top w0.25: v2(2.865,11.734) 2.901,11.77 C39.1 ; C39.1 3.6,11.71 4.65,10.66 U7.14 ; U7.9 7.15,10.6 7.2,10.65 7.47,10.92 C38.1 7.98,10.45 8,10.45 8.066,10.45 8.095,10.42 8.937,10.42 v2(8.968,10.39)
  Bottom w0.25: v2(2.865,11.734) 7.116,11.734 7.2,11.65 8.46,10.39 v2(8.968,10.39)
N$36: C43.2 U3.3 U7.4 | length 4.4
  Top w0.25: U7.4 8.051,7.32 8.763,6.608 8.763,6.492 8.924,6.331 9.752,6.331 10.442,5.641 U3.3@10.442,5.625 ; C43.2 10.353,5.536 U3.3@10.442,5.625 ; U3.3@10.442,5.625 U3.3 U3.3@10.442,5.625
N$37: J4.2_0 J4.2_1 J4.2_2 R17.2 | length 10.8
  Bottom w0.25: R17.2 2.657,2.792 3.8,1.65 7.802,1.65 J4.2_1 7.903,2.553 8,2.65 ; J4.2_2 7.029,2.65 8,2.65 ; J4.2_0 9.378,3.228 8.8,2.65 8,2.65
N$38: C40.1 C41.1 U7.24 | length 2.8
  Top w0.25: U7.24 3.051,4.035 C40.1
  Top w0.3: C41.1 C40.1
RFL1: C25.1 C26.2 U7.22 | length 12.2
  Top w0.25: U7.22 1.015,6.82 0.616,6.421 0.616,4.291 2.797,2.11 3.808,2.11 v2(3.929,2.232)
  Bottom w0.3: C26.2 3.636,5.239 C25.1 3.636,2.524 v2(3.929,2.232)
RFL2: C24.1 C27.2 U7.23 | length 5.4
  Top w0.25: v3(1.169,6.192) 1.296,6.32 U7.23
  Bottom w0.3: C24.1 1.681,5.653 1.346,5.988 1.346,6.015 v3(1.169,6.192) 1.169,7.497 C27.2
RFO1: L3.1 U7.13 | length 2.3
  Top w0.25: U7.13 5.152,9.921 v2(5.152,10.652)
  Bottom w0.25: v2(5.152,10.652) 5.152,10.498 5.4,10.25 5.414,10.236 L3.1
RFO2: L4.1 U7.15 | length 3.1
  Top w0.3: v2(3.775,10.824) 4.15,10.449 U7.15
  Bottom w0.3: L4.1 2.785,9.525 2.964,9.704 2.964,10.014 v2(3.775,10.824)
RX: ESP1.27
SCLK/SCL: ESP1.24 U7.30 | length 21.7
  Top w0.2: U7.30 6.15,3.3 8.749,0.701 16.075,0.701 16.651,0.701 18.45,2.5 18.45,2.654 18.596,2.8 18.599,2.8 19.908,4.109 19.908,6.366 19.4,6.874 19.4,7.125 ESP1.24
SPICSO: ESP1.21 MIC1.1 | length 8.5
  Top w0.2: ESP1.21 18.473,5.93 v1(18.855,5.93)
  Bottom w0.2: MIC1.1 15.414,1.55 16.124,1.55 18.024,3.45 18.854,3.45 19.2,3.796 19.2,5.45 19.2,5.585 v1(18.855,5.93)
SPIHD: ESP1.19 MIC1.6 | length 5.7
  Top w0.2: v1(17.348,4.422) 17.8,4.875 17.8,5.05 17.8,5.189 ESP1.19
  Bottom w0.2: MIC1.6 15.004,1.85 15.6,1.85 16,1.85 17.4,3.25 17.4,4.37 v1(17.348,4.422)
SPIWP: ESP1.20 MIC1.4 | length 5.8
  Top w0.2: ESP1.20 18.194,5.502 v1(18.261,5.502)
  Bottom w0.2: MIC1.4 14.442,3.189 14.442,3.203 14.689,3.45 15.154,3.45 17.206,5.502 v1(18.261,5.502)
STAT_MCP: ESP1.5 U1.1 | length 15.6
  Top w0.2: v1(13.75,9.333) 14.363,9.333 ESP1.5@14.597,9.1 ; v1(23,11.16) 23.56,10.6 U1.1
  Route2 w0.2: v1(13.75,9.333) 13.75,7.95 14.504,7.196 17.979,7.196 19.686,8.903 22.553,8.903 23,9.35 v1(23,11.16)
TX: ESP1.28
VPP: C3.P$2 U1.4 USB-C.A4B9 USB-C.B4A9 | length 16
  Top w0.3: U1.4 v1(26.4,9.45)
  Top w0.5: U1.4 26.6,8.7 C3.P$2
  Bottom w0.3: USB-C.B4A9 21.759,5.25 22.298,5.789 24.939,5.789 26.4,7.25 v1(26.4,9.45) 26.389,9.461 22.348,9.461 21.759,10.05 USB-C.A4B9
pads on no net: ESP1.4 ESP1.13 ESP1.18 L1.DO MIC1.2 MIC1.7 RF.P2 U7.2 U7.17 U7.18 U7.19 U7.21 U7.25 U7.27 U7.28 U7.29 U$1.P1 U$1.P4 USB-C.A8 USB-C.B8

## Polygon pours and split planes (outlines as drawn)
no net on Route2 "Polygon_2_NoNet" (solid, remove dead copper, pour order 3): 9.4,12.85 9.4,10.45 15.4,10.45 16,9.85 16.6,10.45 14.8,12.25 14.8,12.85
GND on Route2 "Polygon_1_Net_GND" (solid, remove dead copper, shelved, pour order 5): 0.2,0.45 27.4,0.45 27.4,13.25 0.2,13.25
no net on Route15 "Polygon_4_NoNet" (solid, remove dead copper, pour order 0): 15.4,10.45 16,9.85 16.6,10.45 14.8,12.25 14.8,12.85 9.4,12.85 9.4,10.45
GND on Route15 "Polygon_2_Net_GND" (solid, remove dead copper, shelved, pour order 4): 0.2,0.45 27.4,0.45 27.4,13.25 0.2,13.25
no net on Top "Polygon_1_NoNet" (solid, remove dead copper, pour order 1): 9.4,12.85 9.4,10.45 15.4,10.45 16,9.85 16.6,10.45 14.8,12.25 14.8,12.85
no net on Bottom "Polygon_3_NoNet" (solid, remove dead copper, pour order 2): 9.4,12.85 9.4,10.45 15.4,10.45 16,9.85 16.6,10.45 14.8,12.25 14.8,12.85
+3V3 on Route14 "Polygon_1_Net_+3V3" (solid, remove dead copper, shelved, pour order 6): 0.2,0.45 27.4,0.45 27.4,13.25 0.2,13.25

## Keep-outs
Keep-Out Layer:
  the board outline again, w0

## Silkscreen, mask and mechanical layers (free items; w line width, h text height)
Dimension:
  the board outline again, w0
tPlace:
  text "-+" at 19.275,7.453 h0.22 r90
bSilkNew:
  text "14.11.2021" at 25.129,4.77 h0.69 r270
  text "Picoclick v3" at 22.691,3.849 h0.69 r270
  text "@maker.moekoe" at 23.91,3.389 h0.69 r270

## Text inside footprints (layer, text, board x,y; h text height)
MIC1: Measures "-0.049in/-1.252mm" at 8.842,5.73 h0.98 r180; Measures "0.041in/1.04mm" at 9.844,7.635 h0.98 r180; Measures "0.082in/2.074mm" at 9.556,-1.204 h0.98 r180; Measures "0.142in/3.607mm" at 9.556,-3.109 h0.98 r180; Measures "0.108in/2.743mm" at 0.662,2.263 h0.98 r180; Measures "0.035in/0.9mm" at 17.18,1.813 h0.98 r180; Measures "Alternate 2 Padstyle: OX90Y60D30P" at -4.486,16.271 h1.97 r180; Measures "Alternate 1 Padstyle: OX60Y90D30P" at -4.486,14.239 h1.97 r180; Measures "Pin 2 Padstyle: EX41Y41D13P" at -1.402,12.207 h1.97 r180; Measures "Default Padstyle: RX21Y24D0T" at -1.605,10.175 h1.97 r180
U3: Measures "0.067in/1.702mm" at 5.852,1.563 h0.98; Measures "0.083in/2.108mm" at 13.467,5.982 h0.98; Measures "0.053in/1.35mm" at -1.187,5.982 h0.98; Measures "0.041in/1.05mm" at 6.14,10.023 h0.98; Measures "Alt 2 Padstyle: OX90Y60D30P" at -4.919,-9.994 h1.97; Measures "Alt 1 Padstyle: OX60Y90D30P" at -4.919,-8.47 h1.97; Measures "Default Padstyle: RX30Y33D0TSM2" at -7.038,-3.898 h1.97; Measures "Pin 1 Padstyle: RX30Y33D0T" at -4.53,-2.374 h1.97
U7: tPlace "*" at 9.316,6.205 h1.97 r180; Measures "0.197in/5.004mm" at 9.442,14.491 h0.98 r180; Measures "0.197in/5.004mm" at 19.771,7.887 h0.98 r180; Measures "0.197in/5.004mm" at -2.156,7.887 h0.98 r180; Measures "0.197in/5.004mm" at 9.442,0.013 h0.98 r180; Measures "0.02in/0.508mm" at 6.907,1.918 h0.98 r180; Measures "0.02in/0.5mm" at -0.251,6.387 h0.98 r180; Measures "Alt 2 Padstyle: OX90Y60D30P" at 20.214,24.245 h1.97 r180; Measures "Alt 1 Padstyle: OX60Y90D30P" at 20.214,22.721 h1.97 r180; Measures "Heat Tab Padstyle: RX142Y142D0T" at 22.705,19.673 h1.97 r180; Measures "Default Padstyle: RX10Y28D0T" at 20.603,18.149 h1.97 r180; tDocu "*" at 7.97,6.205 h1.97 r180